# Altium PCB backplane_1_8.PcbDoc (part 2 of 2)
Units mil, origin at the board's own origin, x right, y up, seen from the top; angles counter-clockwise.
Board outline 6255.13 x 4000 mil, 2 copper layers (Top Layer, Bottom Layer); 85 components, 90 nets, 445 pads, 117 vias.
Unrouted connection lines stored in the file: 6.
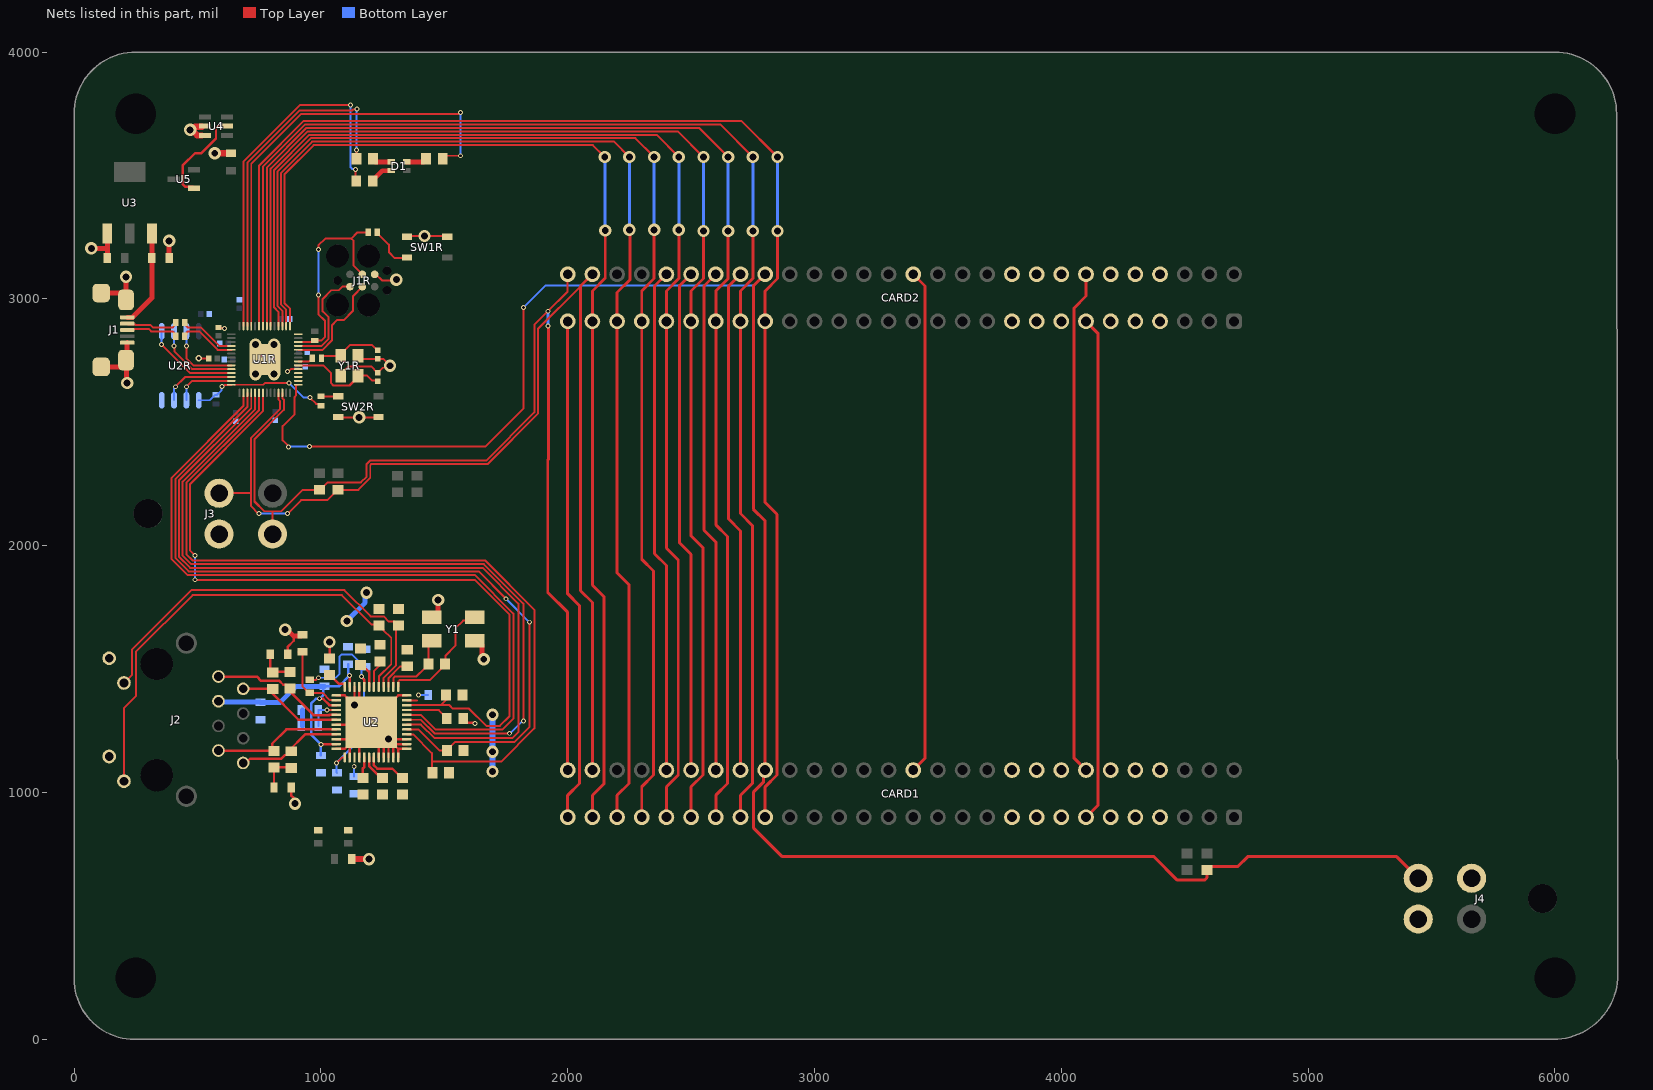
[diagram p2: the nets of this part, all layers, seen from the top]

## Via types
v1: diameter 20, hole 12, Top Layer to Bottom Layer, 64 vias
v2: diameter 50, hole 28, Top Layer to Bottom Layer, 51 vias
v3: diameter 25, hole 15, Top Layer to Bottom Layer, 2 vias

## Nets (pads, with @x,y where several pads share a name; then routed paths per layer and width w, separated by ;. In a path a pad name is that pad's centre, name@x,y a point inside that pad or via, vN(x,y) a via of type N, cw(c..) or ccw(c..) an arc to the next point about the centre after c; other vN are vias at no path point) (continued)
GND_RP2040: C1R.2 C2R.2 C3R.2 C4R.2 C5R.2 C6R.2 C7R.2 C8R.2 C9R.2 C10R.2 C11R.2 C12R.2 C13R.2 C15.2 C16.2 C17.2 C18.2 C19.2 C20.2 C21.2 C22.2 C23.2 C24.2 C25.2 C26.2 C27.2 C28.2 C29.2 C30.2 C31.2 CARD1.4 CARD1.5 CARD1.6 CARD1.8 CARD1.9 CARD1.10 CARD1.47 CARD1.48 CARD1.49 CARD1.51 CARD1.52 CARD1.53 CARD2.4 CARD2.5 CARD2.6 CARD2.8 CARD2.9 CARD2.10 CARD2.47 CARD2.48 CARD2.49 CARD2.51 CARD2.52 CARD2.53 J1.5 J1.6 J1.7 J1.8 J1.9 J1R.6 J2.L2 J2.L4 J3.1 J4.1 J4.4 R12.2 R14.2 SW1R.B1 SW1R.B2 SW2R.B1 SW2R.B2 U1R.19 U1R.57 U2.9 U2.10 U2.13 U2.19 U2.22 U2.24 U2.26 U2.28 U2.32 U2.33 U2.34 U2.35 U2.36 U2.37 U2.38 U2.39 U2.48 U2.49 U2R.4 U3.1 U4.2 U4.3 Y1.2 Y1.4 Y1R.2 Y1R.4 | length 4398.3
  Top Layer w8: v3(505,2759.23) 505.06,2759.17 544.94,2759.17 C5R.2@545,2759.11 ; C4R.2@585,2884.11 587.05,2882.05 607.95,2882.05 v1(610,2880) ; U1R.57@772.87,2727.87 U1R.57@772.87,2754.5 U1R.57@795.7,2777.33 ; v1(865,2705) 868.25,2705 878.38,2715.13 U1R.19@908.21,2715.13 ; SW2R.B1@1070.39,2521.23 1071.63,2520 1232.74,2520 SW2R.B2@1234.37,2521.64 ; Y1R.4@1080,2689.11 1080,2695.01 1111.65,2726.67 1203.78,2726.67 1229.21,2701.23 C1R.2@1230,2701.23 1230.79,2701.23 1250.63,2721.07 1271.96,2721.07 v2(1280,2729.11) 1252.13,2756.98 C2R.2@1230,2756.98 1162.13,2756.98 Y1R.2@1150,2769.11 ; J1R.6@1217.87,3099.5 1222.84,3099.5 1247.84,3074.5 1302.1,3074.5 v2(1305.87,3078.27) ; SW1R.B2@1335.9,3255 1509.02,3255 SW1R.B1@1511.69,3252.32
  Top Layer w10: C28.2@865,1560 865,1590 890,1615 890,1630 890,1633.12 ; C27.2@880,1020 880,987.53 887.35,980.18 887.35,962.65 v2(895,955) ; R14.2@1035,1543.5 v2(1035,1610) ; U2.24@1062.09,1176.73 1096.73,1176.73 U2.49@1116.42,1196.42 ; U2.22@1062.09,1216.1 U2.49@1136.1,1216.1 ; U2.19@1062.09,1275.16 U2.49@1195.16,1275.16 ; U2.13@1062.09,1393.27 1096.77,1393.27 1105.67,1384.37 v2(1136.1,1353.9) ; U2.26@1116.42,1142.09 U2.49@1116.42,1196.42 ; U2.10@1136.1,1427.91 v2(1136.1,1353.9) ; U2.49@1153.29,1336.71 v2(1136.1,1353.9) ; U2.49@1153.31,1336.73 U2.49@1205,1285 ; U2.28@1155.79,1142.09 U2.49@1155.79,1235.79 ; U2.49@1155.79,1334.21 U2.9@1155.79,1427.91 ; U2.32@1234.53,1142.09 1234.53,1200.35 U2.49@1205,1229.88 ; U2.33@1254.21,1142.09 1254.21,1185.67 1210,1229.88 U2.49@1205,1229.88 ; U2.34@1273.9,1142.09 v2(1273.9,1216.1) ; U2.35@1293.58,1142.09 U2.49@1293.58,1196.42 ; U2.36@1313.27,1142.09 1313.27,1176.73 ; U2.37@1347.91,1176.73 1313.27,1176.73 ; U2.38@1347.91,1196.42 U2.49@1293.58,1196.42 ; U2.39@1347.91,1216.1 v2(1273.9,1216.1) ; U2.48@1347.91,1393.27 1313.27,1393.27 U2.49@1205,1285 ; R12.2@1577,1300 1577,1297.5 1592,1282.5 1619.79,1282.5 1622.29,1280 v1(1625,1280) ; U2.49@1116.42,1196.42 U2.49@1136.1,1216.1 ; U2.49@1136.1,1216.1 U2.49@1155.79,1235.79 ; U2.49@1155.79,1235.79 U2.49@1195.16,1275.16 ; U2.49@1195.16,1275.16 U2.49@1205,1285 ; U2.49@1205,1229.88 U2.49@1205,1270 ; U2.49@1205,1270 1258.9,1216.1 v2(1273.9,1216.1) ; U2.49@1205,1270 U2.49@1205,1285 ; v2(1273.9,1216.1) U2.49@1293.58,1196.42 ; U2.49@1293.58,1196.42 1313.27,1176.73
  Top Layer w20: v2(70,3205) 134.72,3205 ; J1.8@110,2724.5 189.34,2724.5 210.39,2745.56 J1.7@210.39,2752.06 ; J1.9@110,3023.71 189.34,3023.71 J1.6@210.2,3002.85 ; U3.1@134.45,3265 134.72,3264.72 134.72,3205 ; C30.2@135,3165 134.72,3165.28 134.72,3205 ; v2(210,3089.23) 210.2,3089.03 J1.6@210.2,3002.85 ; J1.6@210.39,2996.16 210.2,2996.35 J1.6@210.2,3002.85 ; v2(215,2659.23) 212.7,2661.53 212.7,2749.76 J1.7@210.39,2752.06 ; J1.5@215.31,2822.93 214.82,2822.43 214.82,2756.49 J1.7@210.39,2752.06 ; C29.2@385,3165 v2(385,3235) ; v2(855,1660) 863.12,1660 890,1633.12 891.88,1635 920,1635 C26.2@925,1640 ; Y1.4@1450,1709.49 1457.44,1709.49 1475,1727.05 v2(1475,1780) ; Y1.2@1623.23,1615 1635.04,1615 1652.6,1597.44 1652.6,1555.52 1660,1548.12 v2(1660,1540)
  Top Layer w25: v2(470,3685) v2@476.76,3685 ; U4.3@518.5,3662.6 499.17,3662.6 v2@476.76,3685 ; U4.2@518.5,3697.6 489.36,3697.6 v2@476.76,3685 ; v2(570,3590) C31.2@635,3590 ; C23.2@1125,730 v2(1195,730)
  Bottom Layer w20: C16.2@925,1270 C15.2@925,1335
  other v2: 1155,2520 735,2695 810,2695 735,2815 810,2815 1420,3255
KILL_SW: CARD1.37 CARD2.37 J4.3 R36.2 U1R.15 | length 7932.8
  Top Layer w8: v1(869,2400.27) 869,2402.77 845,2426.77 845,2484.63 893.27,2532.9 893.27,2602.24 898.92,2607.89 898.92,2652.07 898.98,2652.14 U1R.15@908.21,2652.14 ; v1(953.66,2401.54) 1666.54,2401.54 1820,2555 v1(1820,2965)
  Top Layer w12: CARD2.37@2800,3100 2752.11,3052.11 2752.11,2147.89 2800,2100 CARD1.37@2800,1091 2792.38,1083.38 2792.38,1041.11 2752.11,1000.84 2752.11,857.43 2869.54,740 4375,740 4470,645 4580,645 4590,655 R36.2@4590,686.5 4603.5,700 4715,700 4755,740 5358.74,740 J4.3@5446.06,652.68
  Bottom Layer w8: v1(869,2400.27) 870.72,2401.98 953.21,2401.98 v1(953.66,2401.54) ; v1(1820,2965) 1909.11,3054.11 2754.11,3054.11 CARD2.37@2800,3100
LED_B: R32.2 U1R.39 | length 1843
  Top Layer w8: U1R.39@717.76,2889.83 717.76,3548.36 918.4,3749 1555.75,3749 1561.75,3755 v1(1565,3755) ; R32.2@1493.5,3567.72 1505.78,3580 v1(1565,3580)
  Bottom Layer w8: v1(1565,3580) v1(1565,3755)
LED_G: R33.2 U1R.40 | length 1398.6
  Top Layer w8: U1R.40@702.01,2889.83 702.01,3552.41 912.6,3763 1126.28,3763 1130.55,3767.27 1143.43,3767.27 v1(1145.72,3769.57) ; R33.2@1144.5,3567.72 v1(1144.5,3603)
  Bottom Layer w8: v1(1144.5,3603) 1145.11,3603.61 1145.11,3768.95 v1(1145.72,3769.57)
LED_R: R34.2 U1R.41 | length 1518.6
  Top Layer w8: U1R.41@686.26,2889.83 686.26,3556.46 914.8,3785 v1(1120,3785) ; v1(1140,3525) 1140,3480.71 R34.2@1143,3477.72
  Bottom Layer w8: v1(1120,3785) 1120,3533.38 1126.63,3526.74 1138.26,3526.74 v1(1140,3525)
NetC2R_1: C2R.1 R1R.2 Y1R.3 | length 265.2
  Top Layer w8: R1R.2@1002.4,2759.11 1002.4,2762.28 1009.23,2769.11 Y1R.3@1080,2769.11 1080,2775.01 1119.09,2814.11 1206.34,2814.11 1229.21,2791.23 C2R.1@1230,2791.23
NetC15_1: C15.1 C16.1 U2.16 | length 137.4
  Top Layer w8: v1(1025,1335) 1025.39,1334.61 1061.69,1334.61 U2.16@1062.09,1334.21
  Bottom Layer w8: C16.1@990,1270 C15.1@990,1335 v1(1025,1335)
NetC27_1: C27.1 R15.2 R16.2 | length 152.3
  Top Layer w10: C27.1@810,1020 R16.2@810,1101.73 ; R16.2@810,1101.5 878.5,1101.5 R15.2@880,1100
NetC28_1: C28.1 R17.2 R18.2 | length 147.1
  Top Layer w10: C28.1@795,1560 795,1497 R17.2@805,1487 ; R17.2@805,1488.5 R18.2@875,1488.5
NetD1_1: D1.1 R34.1 | length 94
  Top Layer w20: R34.1@1210,3477.72 1210,3480.22 1248.95,3519.17 1284.17,3519.17 D1.1@1285,3520
NetD1_2: D1.2 R33.1 | length 79.9
  Top Layer w20: R33.1@1211.5,3567.72 1211.5,3565.43 1221.5,3555.43 D1.2@1285,3555.43
NetD1_3: D1.3 R32.1 | length 84.9
  Top Layer w20: D1.3@1347.99,3555.43 1416.5,3555.43 1426.5,3565.43 R32.1@1426.5,3567.72
NetJ2_L1: J2.L1 R24.2 U2.5 | length 1967
  Top Layer w8: J2.L1@201.98,1045.93 201.98,1341.98 250,1390 250,1570 480,1800 1085,1800 1205.19,1679.81 1231.69,1679.81 R24.2@1235,1676.5 1237.5,1676.5 1253.5,1660.5 1253.5,1658 1285,1626.5 1285,1519.86 1235.14,1470 1235.14,1428.53 U2.5@1234.53,1427.91
NetJ2_L3: J2.L3 R25.2 U2.4 | length 1658.1
  Top Layer w8: J2.L3@202,1444.04 235,1477.03 235,1580 475,1820 1095,1820 1201.5,1713.5 1254.64,1713.5 1275.64,1692.5 1299,1692.5 R25.2@1315,1676.5 ; U2.4@1254.21,1427.91 1254.21,1464.21 1305,1515 R25.2@1305,1676.5
NetJ2_R1: J2.R1 R18.1 U2.17 | length 548.2
  Top Layer w10: J2.R1@585,1470 740.44,1470 757.94,1452.5 831.5,1452.5 847.5,1436.5 857.5,1436.5 862.5,1431.5 862.5,1421.5 970.52,1313.48 1033.13,1313.48 1034.1,1314.45 1062.01,1314.45 U2.17@1062.09,1314.53
NetJ2_R2: J2.R2 R17.1 U2.18 | length 431
  Top Layer w10: J2.R2@685,1420 787.5,1420 793.25,1414.25 793.25,1410.75 909.16,1294.84 U2.18@1062.09,1294.84
NetJ2_R7: J2.R7 R16.1 U2.20 | length 545.8
  Top Layer w10: J2.R7@585,1170 R16.1@815.11,1170 ; R16.1@795,1168.5 802.64,1176.14 802.64,1197.64 860.47,1255.47 U2.20@1062.09,1255.47
NetJ2_R8: J2.R8 R15.1 U2.21 | length 430.9
  Top Layer w10: J2.R8@685,1120 696.14,1120 713.64,1137.5 840.07,1137.5 854.57,1152 862.5,1152 867.5,1157 867.5,1167 936.29,1235.79 U2.21@1062.09,1235.79
NetR6R_1: R6R.1 SW1R.A2 | length 191.2
  Top Layer w8: R6R.1@1234.07,3264.63 R6R.1@1228.7,3270 1228.7,3266.06 1275,3219.76 1275,3190 1299.65,3165.35 1345.98,3165.35 SW1R.A2@1348.31,3167.68
NetR7R_1: R7R.1 SW2R.A1 | length 70.8
  Top Layer w8: R7R.1@1000,2605 1069.51,2605 SW2R.A1@1070.39,2605.88
NetR12_1: R12.1 U2.45 | length 177.7
  Top Layer w8: U2.45@1347.91,1334.21 1478.29,1334.21 1510,1302.5 R12.1@1510,1300
NetR14_1: R14.1 U2.12 | length 89
  Top Layer w10: R14.1@1035,1476.5 1037.5,1476.5 1073.86,1440.14 1096.65,1440.14 1096.73,1440.06 U2.12@1096.73,1427.91
NetR19_1: R19.1 U2.1 Y1.3 | length 501.3
  Top Layer w8: U2.1@1313.27,1427.91 1314.19,1428.83 1314.19,1450.31 1318.88,1455 1441,1455 1503.5,1517.5 R19.1@1503.5,1520 1504.81,1521.31 1504.81,1554.81 1545,1595 1545,1665 1576.54,1696.54 1610.28,1696.54 Y1.3@1623.23,1709.49
NetR19_2: R19.2 U2.2 Y1.1 | length 304
  Top Layer w8: U2.2@1293.58,1427.91 1293.58,1463.58 1300,1470 1386.5,1470 1418,1501.5 1420.5,1501.5 1436.5,1517.5 1436.5,1601.5 Y1.1@1450,1615
NetR20_2: R20.2 U2.7 | length 93.4
  Top Layer w10: R20.2@1175,1513 1175,1509 1195.16,1488.84 U2.7@1195.16,1427.91
NetR21_2: R21.2 U2.31 | length 168.5
  Top Layer w10: U2.31@1214.84,1142.09 1214.84,1110.16 1228.61,1096.39 1289.61,1096.39 1327.5,1058.5 R21.2@1330,1058.5
NetR22_2: R22.2 U2.30 | length 109.9
  Top Layer w10: U2.30@1195.16,1142.09 1195.16,1107.22 1228.87,1073.5 1235,1073.5 R22.2@1250,1058.5
NetR23_2: R23.2 U2.29 | length 85.9
  Top Layer w10: R23.2@1170,1058.5 1170,1097.75 1175.47,1103.23 U2.29@1175.47,1142.09
NetR26_2: R26.2 U2.3 | length 117.4
  Top Layer w8: U2.3@1273.9,1427.91 1273.9,1463.9 1320.19,1510.19 1332.19,1510.19 R26.2@1335,1513
NetR27_2: R27.2 U2.6 | length 94.1
  Top Layer w8: U2.6@1214.84,1427.91 1214.84,1491.34 R27.2@1236.5,1513
NetU1R_16: U1R.16
NetU1R_17: U1R.17
NetU1R_18: U1R.18
NetU1R_28: U1R.28
NetU4_5: U4.5 U5.1 | length 398
  Top Layer w10: U5.1@486,3447.5 480,3453.5 451.5,3453.5 440,3465 440,3540 491,3591 516,3591 575,3650 575,3690 585,3700 U4.5@620,3700
PWM_1: CARD1.20 CARD2.20 U1R.37 | length 5621.9
  Top Layer w8: U1R.37@749.25,2889.83 749.25,3540.26 929.99,3721 940.8,3721 2704,3721 v2(2850,3575)
  Top Layer w12: CARD1.20@2800,900 2800,1023.27 2847.89,1071.16 2847.89,2127.11 2800,2175 CARD2.20@2800,2909 2800,3032.27 2850,3082.27 v2(2850,3275)
  Bottom Layer w12: v2(2850,3275) v2(2850,3575)
PWM_2: CARD1.21 CARD2.21 U1R.36 | length 5479
  Top Layer w8: U1R.36@765,2903.06 765,3536.21 935.79,3707 946.6,3707 2618,3707 v2(2750,3575)
  Top Layer w12: CARD1.21@2700,900 2700,988.48 2747.89,1036.37 2747.89,2082.11 2700,2130 CARD2.21@2700,2909 2700,3032.27 2750,3082.27 v2(2750,3275)
  Bottom Layer w12: v2(2750,3275) v2(2750,3575)
PWM_3: CARD1.22 CARD2.22 U1R.35 | length 5349.2
  Top Layer w8: U1R.35@780.75,2903.06 780.75,3532.16 941.59,3693 952.4,3693 2532,3693 v2(2650,3575)
  Top Layer w12: CARD1.22@2600,900 2600,988.48 2647.89,1036.37 2647.89,2037.11 2600,2085 CARD2.22@2600,2909 2600,3032.27 2650,3082.27 v2(2650,3275)
  Bottom Layer w12: v2(2650,3275) v2(2650,3575)
PWM_4: CARD1.23 CARD2.23 U1R.34 | length 5233.1
  Top Layer w8: U1R.34@796.5,2889.83 796.5,2959.31 796,2959.8 796,3527.61 947.39,3679 2446,3679 v2(2550,3575)
  Top Layer w12: CARD1.23@2500,900 2500,1023.27 2547.89,1071.16 2547.89,1992.11 2500,2040 CARD2.23@2500,2909 2500,3032.27 2550,3082.27 v2(2550,3275)
  Bottom Layer w12: v2(2550,3275) v2(2550,3575)
PWM_5: CARD1.24 CARD2.24 U1R.32 | length 5111.4
  Top Layer w8: U1R.32@827.99,2889.83 827.99,2947.61 810,2965.6 810,3521.81 953.19,3665 963.99,3665 2360,3665 v2(2450,3575)
  Top Layer w12: CARD1.24@2400,900 2400,1023.27 2447.89,1071.16 2447.89,1942.11 2400,1990 CARD2.24@2400,2909 2400,3032.27 2450,3082.27 v2(2450,3280)
  Bottom Layer w12: v2(2450,3280) v2(2450,3575)
PWM_6: CARD1.25 CARD2.25 U1R.31 | length 4982.7
  Top Layer w8: U1R.31@843.74,2889.83 843.74,2951.66 824.5,2970.91 824.5,3516.51 958.99,3651 969.79,3651 2274,3651 v2(2350,3575)
  Top Layer w12: CARD1.25@2300,900 2300,1023.27 2347.89,1071.16 2347.89,1897.11 2300,1945 CARD2.25@2300,2909 2300,3032.27 2350,3082.27 v2(2350,3280)
  Bottom Layer w12: v2(2350,3280) v2(2350,3575)
PWM_7: CARD1.26 CARD2.26 U1R.30 | length 4856.2
  Top Layer w8: U1R.30@859.49,2889.83 859.49,2955.71 838.5,2976.71 838.5,3510.71 964.79,3637 975.59,3637 2188,3637 v2(2250,3575)
  Top Layer w12: CARD1.26@2200,900 2200,988.48 2247.89,1036.37 2247.89,1842.11 2200,1890 CARD2.26@2200,2909 2200,3025.46 2252.11,3077.57 2252.11,3277.89 v2(2250,3280)
  Bottom Layer w12: v2(2250,3280) v2(2250,3575)
PWM_8: CARD1.27 CARD2.27 U1R.29 | length 4727.9
  Top Layer w8: U1R.29@875.24,2889.83 875.24,2959.76 852.5,2982.5 852.5,3504.91 970.59,3623 2102,3623 v2(2150,3575)
  Top Layer w12: CARD1.27@2100,900 2100,988.48 2147.89,1036.37 2147.89,1792.11 2100,1840 CARD2.27@2100,2909 2100,3032.27 2152.11,3084.38 v2(2152.11,3277.11)
  Bottom Layer w12: v2(2150,3575) 2151.06,3573.94 2151.06,3278.17 v2(2152.11,3277.11)
QSPI_SCLK_RP2040: U1R.52 U2R.6 | length 342.9
  Top Layer w8: v1(405,2810) 406.11,2808.89 406.11,2788 478.98,2715.13 U1R.52@637.54,2715.13
  Bottom Layer w8: v1(405,2810) U2R.6@405,2868.87
QSPI_SD0_RP2040: U1R.53 U2R.5 | length 384.3
  Top Layer w8: v1(355,2815) 470.62,2699.38 U1R.53@637.54,2699.38
  Bottom Layer w8: v1(355,2815) U2R.5@355,2868.87
QSPI_SD1_RP2040: U1R.55 U2R.2 | length 247.2
  Top Layer w8: v1(455,2644.11) 478.78,2667.89 U1R.55@637.54,2667.89
  Bottom Layer w8: U2R.2@455,2589.34 v1(455,2644.11)
QSPI_SD2_RP2040: U1R.54 U2R.3 | length 300.7
  Top Layer w8: v1(410,2644.11) 449.53,2683.63 U1R.54@637.54,2683.63
  Bottom Layer w8: U2R.3@405,2589.34 405,2637.21 410,2642.21 v1(410,2644.11)
QSPI_SD3_RP2040: U1R.51 U2R.7 | length 304
  Top Layer w8: v1(455,2810) 455,2759.11 483.23,2730.88 U1R.51@637.54,2730.88
  Bottom Layer w8: v1(455,2810) U2R.7@455,2868.87
QSPI_SS_RP2040: R5R.2 R7R.2 U1R.56 U2R.1 | length 556.6
  Top Layer w8: v1(600,2645) 603.25,2645 610.32,2652.07 U1R.56@637.54,2652.14 U1R.56@637.54,2652.14 ; U1R.56@650.76,2652.14 767.14,2652.14 775,2660 v1(870,2660) ; v1(955,2600) 980.57,2574.43 993.17,2574.43 R7R.2@1000,2567.6
  Bottom Layer w8: U2R.1@505,2589.34 548.9,2589.34 571.06,2611.51 578.94,2611.51 597.7,2630.28 597.7,2642.7 v1(600,2645) ; v1(870,2660) 929,2601 954,2601 v1(955,2600)
RUN_RP2040: J1R.4 R4R.2 R6R.2 U1R.26 | length 895.9
  Top Layer w8: U1R.26@908.21,2825.37 908.27,2825.43 967.5,2825.43 977.87,2835.8 R4R.2@983.03,2835.8 ; R4R.2@975,2831.71 1002.6,2831.71 1017,2846.11 1017,2910.37 990,2937.37 v1(990,3015) ; v1(990,3200) 990,3216.63 1017.87,3244.5 1122.87,3244.5 ; J1R.4@1167.87,3099.5 1132.37,3135 1132.37,3235 1122.87,3244.5 ; R6R.2@1191.3,3270 1148.37,3270 1122.87,3244.5
  Bottom Layer w8: v1(990,3015) v1(990,3200)
SENS_SCL: CARD1.29 CARD2.29 J3.3 R28.2 U1R.12 | length 4440.2
  Top Layer w8: J3.3@803.94,2047.32 803.94,2139.62 ; U1R.12@843.74,2619.17 843.8,2619.1 843.8,2597.8 850,2591.61 850,2550 730.88,2430.88 730.88,2179.12 770.38,2139.62 803.94,2139.62 ; CARD2.29@2000,3100 2000,3030 v1(1920,2950) 1865,2895 1865,2540.6 1669.4,2345 1198.89,2345 1185,2331.11 1185,2279.8 1161.7,2256.5 1027.5,2256.5 997.5,2226.5 R28.2@995,2226.5 926.5,2226.5 839.62,2139.62 803.94,2139.62
  Top Layer w12: v1(1920,2890) 1921.33,2888.67 1921.33,2349.78 1919.14,2347.59 1919.14,1810.86 2000,1730 CARD1.29@2000,1091
  Bottom Layer w12: v1(1920,2890) v1(1920,2950)
SENS_SDA: CARD1.30 CARD2.30 J3.2 R29.2 U1R.11 | length 4650.3
  Top Layer w8: J3.2@587.4,2212.68 716.88,2212.68 ; v1(750,2130) 746.75,2130 716.88,2159.87 716.88,2212.68 ; U1R.11@827.99,2619.17 827.99,2592.56 834.75,2585.81 834.75,2555 716.88,2437.13 716.88,2212.68 ; v1(865,2130) 920,2185 1026,2185 1067.5,2226.5 R29.2@1070,2226.5 1151.5,2226.5 1200,2275 1200,2326.31 1204.69,2331 1675.2,2331 1880,2535.8 1880,2880 2052.11,3052.11
  Top Layer w12: CARD1.30@2100,1091 2100,1770 2052.11,1817.89 2052.11,3052.11 CARD2.30@2100,3100
  Bottom Layer w8: v1(750,2130) v1(865,2130)
SPARE1: CARD1.7 CARD2.7 | length 2048.7
  Top Layer w12: CARD1.7@4100,900 4147.89,947.89 4147.89,2861.11 CARD2.7@4100,2909
SPARE2: CARD1.28 CARD2.28 | length 2048.7
  Top Layer w12: CARD1.28@2000,900 2000,988.48 2047.89,1036.37 2047.89,1757.11 2000,1805 CARD2.28@2000,2909
SPARE3: CARD1.33 CARD2.33 | length 2048.7
  Top Layer w12: CARD1.33@2400,1091 2400,1920 2352.11,1967.89 2352.11,3052.11 CARD2.33@2400,3100
SPARE4: CARD1.34 CARD2.34 | length 2048.7
  Top Layer w12: CARD1.34@2500,1091 2500,1965 2452.11,2012.89 2452.11,3052.11 CARD2.34@2500,3100
SPARE5: CARD1.35 CARD2.35 | length 2048.7
  Top Layer w12: CARD1.35@2600,1091 2600,2015 2552.11,2062.89 2552.11,3052.11 CARD2.35@2600,3100
SPARE6: CARD1.36 CARD2.36 | length 2048.7
  Top Layer w12: CARD1.36@2700,1091 2700,2060 2652.11,2107.89 2652.11,3052.11 CARD2.36@2700,3100
SPARE7: CARD1.43 CARD2.43 | length 2048.7
  Top Layer w12: CARD1.43@3400,1091 3447.89,1138.89 3447.89,3052.11 CARD2.43@3400,3100
SPARE8: CARD1.50 CARD2.50 | length 2048.7
  Top Layer w12: CARD1.50@4100,1091 4052.11,1138.89 4052.11,2963.63 4100,3011.52 CARD2.50@4100,3100
SPI_CLK: U1R.4 U2.42 | length 3244.3
  Top Layer w8: U1R.4@717.76,2619.17 717.76,2557.76 425,2265 425,1955.2 470.2,1910 1655,1910 1800,1765 1800,1245 1775,1220 1460.4,1220 1405.24,1275.16 U2.42@1347.91,1275.16
SPI_MISO: U1R.2 U2.44 | length 3158.1
  Top Layer w8: U1R.2@686.32,2605.94 686.32,2566.32 395,2275 395,1945.6 458.6,1882 1623,1882 1780,1725 1780,1299.5 1735.5,1255 1465,1255 1405.47,1314.53 U2.44@1347.91,1314.53
SPI_MOSI: U1R.5 U2.43 | length 3232
  Top Layer w8: U1R.5@733.5,2619.17 733.5,2553.5 440,2260 440,1960 475,1925 1660,1925 1820,1765 v1(1820,1290) ; U2.43@1347.91,1294.84 1405.36,1294.84 1460.2,1240 v1(1765,1240)
  Bottom Layer w8: v1(1765,1240) 1767.5,1240 1817.5,1290 v1(1820,1290)
SWCLK_RP2040: J1R.3 U1R.24 | length 437.5
  Top Layer w8: U1R.24@908.21,2793.87 1007.04,2793.87 1045,2831.83 1045,2894.11 1064.89,2914 1092.93,2914 1130,2951.07 1130,3011.63 J1R.3@1167.87,3049.5
SWDIO_RP2040: J1R.1 U1R.25 | length 437.3
  Top Layer w8: U1R.25@908.21,2809.62 1002.99,2809.62 1031,2837.63 1031,2925.81 1007.37,2949.44 1007.37,2999.56 1042.81,3035 1072.92,3035 1087.42,3049.5 J1R.1@1117.87,3049.5
USB_N: J1.2 R3R.1 | length 215
  Top Layer w8: J1.2@215.31,2899.7 219.19,2895.82 248.54,2895.82 249.47,2894.9 308.76,2894.9 319.05,2884.61 399.79,2884.61 404.47,2889.29 404.47,2897.28 R3R.1@411.3,2904.11
USB_P: J1.3 R2R.1 | length 215
  Top Layer w8: J1.3@215.31,2874.11 219.19,2877.98 248.54,2877.98 249.47,2878.9 302.13,2878.9 312.42,2868.61 399.79,2868.61 404.47,2863.92 404.47,2855.93 R2R.1@411.3,2849.11
USB_RP2040_N: R3R.2 U1R.46 | length 232.7
  Top Layer w8: R3R.2@448.7,2904.11 455.53,2897.28 455.53,2889.29 460.21,2884.61 513.27,2884.61 588.26,2809.62 U1R.46@637.54,2809.62
USB_RP2040_P: R2R.2 U1R.47 | length 232.6
  Top Layer w8: R2R.2@448.7,2849.11 455.53,2855.93 455.53,2863.92 460.21,2868.61 507,2868.61 581.74,2793.87 U1R.47@637.54,2793.87
VUSB: C29.1 J1.1 U3.3 | length 393.7
  Top Layer w20: J1.1@215.31,2925.29 236.65,2925.29 315,3003.64 C29.1@315,3165 315.28,3165.28 315.28,3264.72 U3.3@315.55,3265
W5200_1V8_OUT: C26.1 L3.2 U2.14 | length 309.2
  Top Layer w8: C26.1@910,1570 914,1570 925,1559 925,1429.68 950.87,1403.82 L3.2@955,1403.82 1007.39,1403.82 1036.71,1374.5 1061.17,1374.5 U2.14@1062.09,1373.58
W5200_1V8D: C24.1 C25.1 L3.1 U2.8 U2.25 | length 890
  Top Layer w8: L3.1@955,1456.18 979.77,1456.18 988.59,1465 v1(990,1465) ; v1(1063.25,1120) 1084.5,1141.25 1095.9,1141.25 U2.25@1096.73,1142.09
  Top Layer w10: v1(1165,1470) 1165,1467.29 1175.39,1456.9 U2.8@1175.39,1442.6
  Bottom Layer w8: v1(990,1465) 1060.31,1465 1075,1479.69 1075,1550 1085,1560 1125,1560 1175,1510 C24.1@1176,1510 ; C25.1@1065,1080 1063.25,1081.75 v1(1063.25,1120) 1175,1231.75 1175,1459.31 1165,1469.31 v1(1165,1470) 1165,1499 1167.34,1501.34 C24.1@1176,1510 ; C24.1@1180,1510 C24.1@1176,1510
W5200_3V3A: C17.1 C18.1 C19.1 C20.1 J2.R3 L1.1 U2.11 U2.15 U2.23 | length 1142
  Top Layer w10: v1(995,1380) 995.87,1379.13 1009.48,1379.13 1034.63,1353.98 1062.01,1353.98 U2.15@1062.09,1353.9 ; v1(1000,1195) 1001.34,1196.34 1062.01,1196.34 U2.23@1062.09,1196.42 ; U2.11@1116.42,1427.91 v1(1116.42,1473.82)
  Bottom Layer w10: C20.1@1000,1150 v1(1000,1195) 960,1235 960,1360 979.82,1379.82 994.82,1379.82 1010,1395 1010,1425 C18.1@1015,1430 1072.59,1430 v1(1116.42,1473.82) 1116.42,1476.53 1110,1482.95 C19.1@1110,1520
  Bottom Layer w20: J2.R3@585,1370 587.5,1367.5 752.5,1367.5 C17.1@755,1365 835,1365 900,1430 C18.1@1015,1430
W5200_3V3D: C21.1 C22.1 L2.1 R9.1 R10.1 R11.1 R20.1 R21.1 R22.1 R23.1 R24.1 R25.1 R26.1 R27.1 U2.27 U2.47 | length 510.9
  Top Layer w8: U2.47@1347.91,1373.58 1388.58,1373.58
  Top Layer w12: R27.1@1237.5,1598.5 R27.1@1240,1598.5 ; R25.1@1315,1743.5 R25.1@1317.5,1743.5 ; R9.1@1578.5,1170 R9.1@1583.5,1165
  Bottom Layer w8: C21.1@1135,1065 v1(1135,1105) ; v1(1395,1395) C22.1@1435,1395
  Bottom Layer w20: v2(1105,1695) 1179.26,1769.26 1179.26,1804.26 v2(1185,1810)
  Bottom Layer w25: v2(1695,1085) v2(1695,1315)
  other v2: 1695,1165
WIZ_INT: R10.2 U1R.6 U2.40 | length 3433.6
  Top Layer w8: U1R.6@749.25,2619.17 749.25,2549.25 455,2255 455,1965 480,1940 1665,1940 1865,1740 1865,1260 1730,1125 1450,1125 ; U2.40@1347.91,1235.79 1374.21,1235.79 1450,1160 1450,1125 ; R10.2@1450,1090 1450,1125
WIZ_RST: R11.2 U1R.7 U2.46 | length 3135.7
  Top Layer w8: v1(490,1862) 1623,1862 1765,1720 1765,1310 1725,1270 1670,1270 1600,1340 1535,1340 1521.1,1353.9 1486.4,1353.9 ; v1(490,1960) 470,1980 470,2250 765,2545 U1R.7@765,2619.17 ; U2.46@1347.91,1353.9 1486.4,1353.9 ; R11.2@1510,1380 1510,1377.5 1486.4,1353.9
  Bottom Layer w8: v1(490,1862) v1(490,1960)
WIZ_SEL: R9.2 U1R.3 U2.41 | length 3330.3
  Top Layer w8: U1R.3@702.01,2619.17 702.01,2562.01 410,2270 410,1950.4 464.4,1896 1639,1896 v1(1750,1785) ; U2.41@1347.91,1255.47 1394.53,1255.47 1480.64,1169.36 R9.2@1510.64,1169.36 ; R9.2@1511.5,1170 1511.5,1172.5 1544,1205 1785,1205 1845,1265 v1(1845,1690)
  Bottom Layer w8: v1(1750,1785) v1(1845,1690)
XIN_RP2040: C1R.1 U1R.20 Y1R.1 | length 408.3
  Top Layer w8: U1R.20@908.21,2730.88 1009.12,2730.88 1040,2700 1040,2660 1050.89,2649.11 1115.91,2649.11 1150,2683.2 Y1R.1@1150,2689.11 1187.37,2689.11 1206.19,2670.29 1226.69,2670.29 C1R.1@1230,2666.98
XOUT_RP2040: R1R.1 U1R.21 | length 64.3
  Top Layer w8: U1R.21@908.21,2746.63 952.52,2746.63 954.24,2748.34 958.17,2748.34 965,2755.17 R1R.1@965,2759.11
pads on no net: CARD1.14 CARD1.15 CARD1.16 CARD1.39 CARD1.40 CARD1.41 CARD1.42 CARD2.14 CARD2.15 CARD2.16 CARD2.39 CARD2.40 CARD2.41 CARD2.42 J1.4 J1R.A J1R.B J1R.C J1R.D J1R.E J1R.F J1R.G J2. J2.R4 J2.R5 J2.R6 J2.S1 J2.S2 J3. J4. SW1R.A1 SW2R.A2 U4.4

## Polygon pours and split planes (outlines as drawn)
3V3_RP2040 on Top Layer "3V3_RP2040" (solid, pour order 0): 35,3535 1755,3535 1755,2455 35,2455
W5200_3V3A on Top Layer "W5200_3V3A_L01_P003" (solid, pour order 3): 1055.29,1781.58 1055.29,826.58 380.29,826.58 380.29,1781.58
W5200_3V3D on Top Layer "W5200_3V3D_L01_P002" (solid, pour order 2): 1062.09,1855 1750,1855 1750,830 1062.09,830
GND_RP2040 on Bottom Layer "GND_RP2040_L02_P001" (solid, pour order 1): 35,3850 6215,3850 6215,135 35,135

## Keep-outs
Keep-Out Layer:
  lines w10: 0,245 ccw(c245,245) 245,0 5993.3,0 ccw(c5993.3,261.83) 6255.13,261.83 6250.01,3750 ccw(c6000,3750) 6000,4000 255,4000 ; 0,3750 cw(c250,3750) 250,4000 ; 5,309.23 5,3814.23 ; 3750,0 3865,0

## Other copper
Top Layer:
  rectangle net 3V3_RP2040: 1745,3360 4740,3535
  rectangle net 3V3_RP2040: 4465,810 4740,3500
  rectangle net +5: 3465,810 3735,3190
  pour cut-out: 1039.69,2649.11 1039.72,2649.07 1039.72,2628.67 1264.45,2628.67 1251.81,2641.31 1251.81,2645.96 1216.25,2645.96 1192.19,2670.02 1170.02,2670.02 1155,2655 1145,2655
  pour cut-out: 1466.5,1552.5 1466.5,1510.39 1468.97,1507.93 1471.97,1507.93 1473.5,1509.46 1473.5,1552.5
  pour cut-out: 855,1145 855,1125 907.5,1125 912.5,1130 912.5,1137
  pour cut-out: 1040,1205 1040,1225 985,1225 989.19,1205
  pour cut-out: 1035,1285 1035,1265 900,1265 898.34,1266.66 898.34,1284.03
  pour cut-out: 1075.31,3118 1086.06,3113.94 1118.94,3113.94 1125,3120 1125,3150 1100,3150 1090,3140
  pour cut-out: 840,2759.23 890,2709.23 890,2664.23 800,2664.23 800,2699.23
  pour cut-out: 749.78,2652.14 750,2652.36 750,2869.11 697.39,2869.11 670.07,2841.79 670.07,2769.17 655,2754.11 655,2654.11

## Silkscreen, mask and mechanical layers (free items; w line width, h text height)
Top Overlay:
  drawing of 44 lines, arcs and shapes, not listed
  text "REV 1.8.2" at 4985,3695 h60
  text "Reset" at 1300,3295 h60
  text "Power Board" at 2200,3215 h30
  text "Notes" at 5010,3210 h60
  text "Program" at 1000,2359.99 h60
  text "SDA 3V3 / GND SCL" at 920,1940 h60
  text "ESC Board" at 2200,1210 h30
  text "KILL GND / GND  AUX" at 4735,480 h60
  text "The Underwater Robotics Team" at 1485,260 h60
  text "Puddles Mk 1.8 Backplane" at 1485,154.99 h60